# Altium PCB IN-14 Nixie Clock.PcbDoc
Units mm, origin at the board's own origin, x right, y up, seen from the top; angles counter-clockwise.
Board outline 150 x 70 mm, 2 copper layers (Top Layer, Bottom Layer); 89 components, 115 nets, 425 pads, 109 vias.
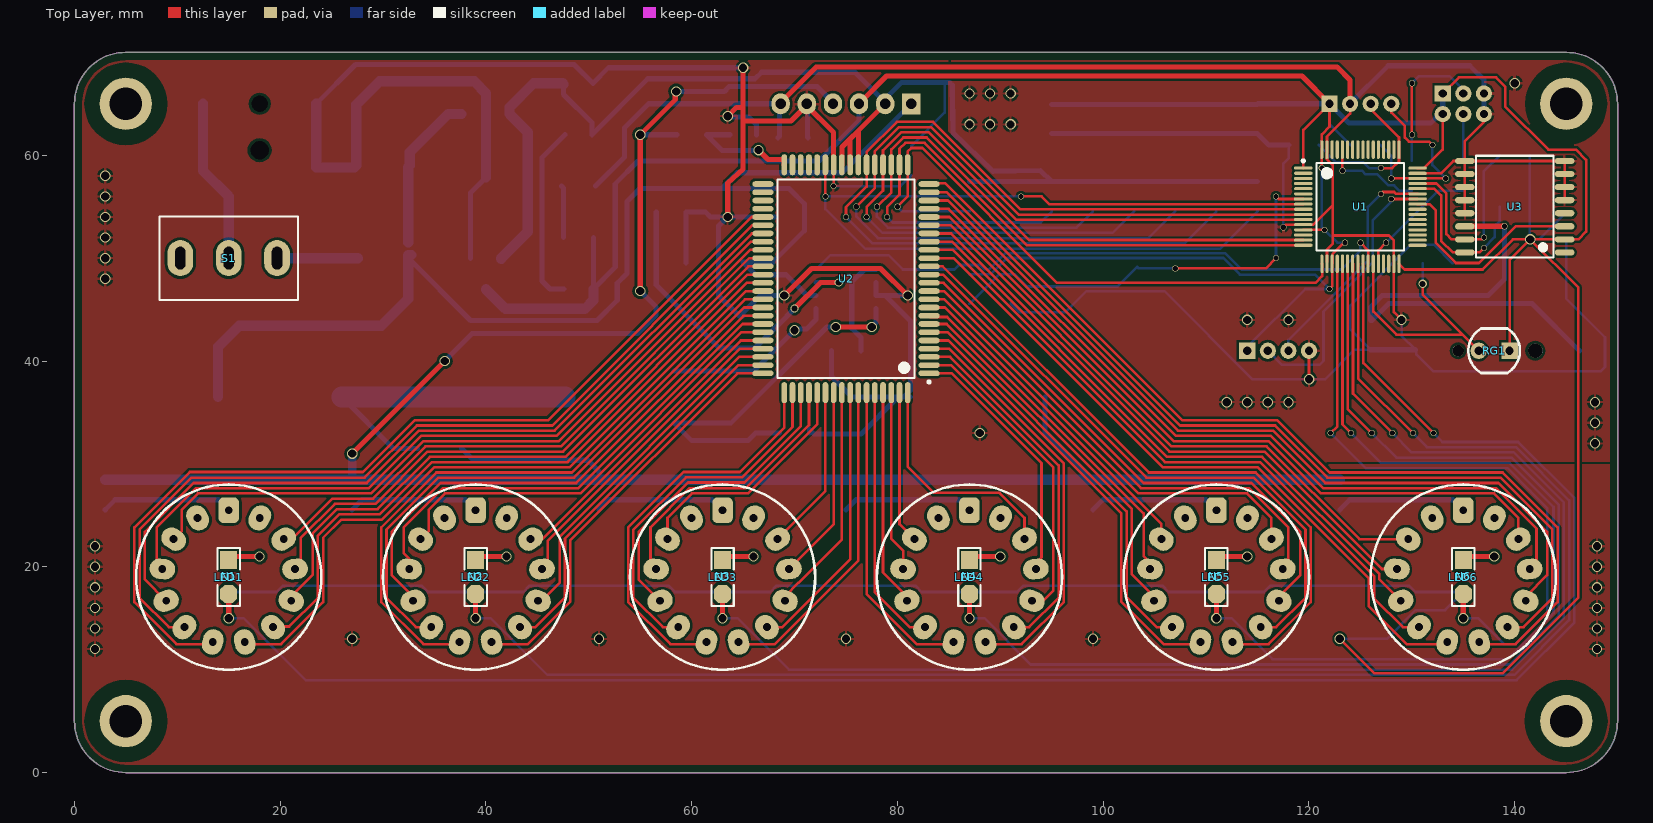
[diagram p0: Top Layer view]
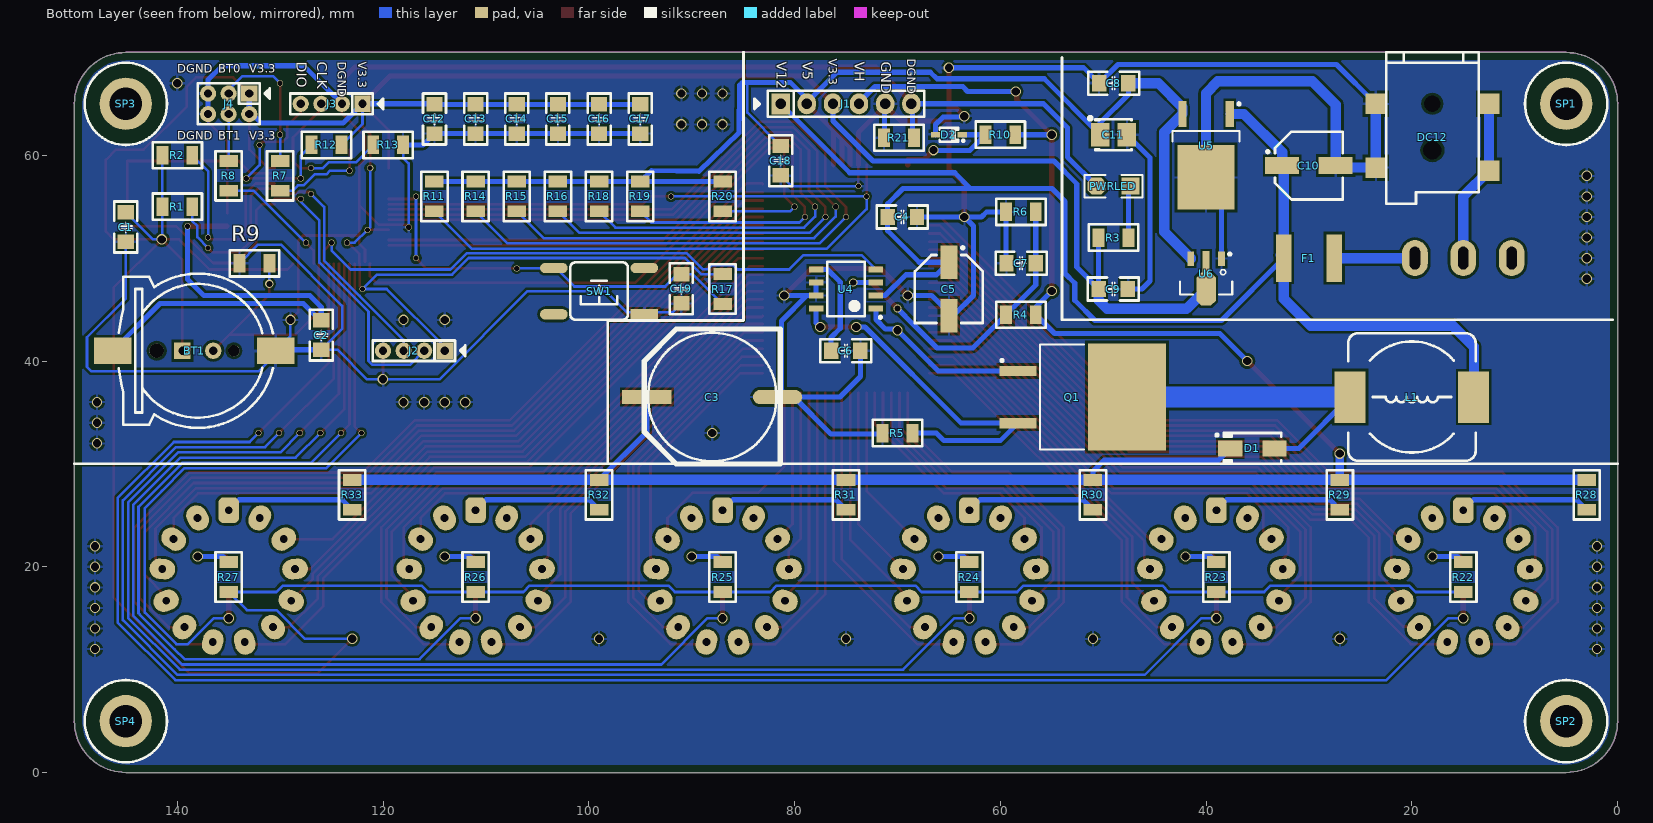
[diagram p1: Bottom Layer view, seen from below]
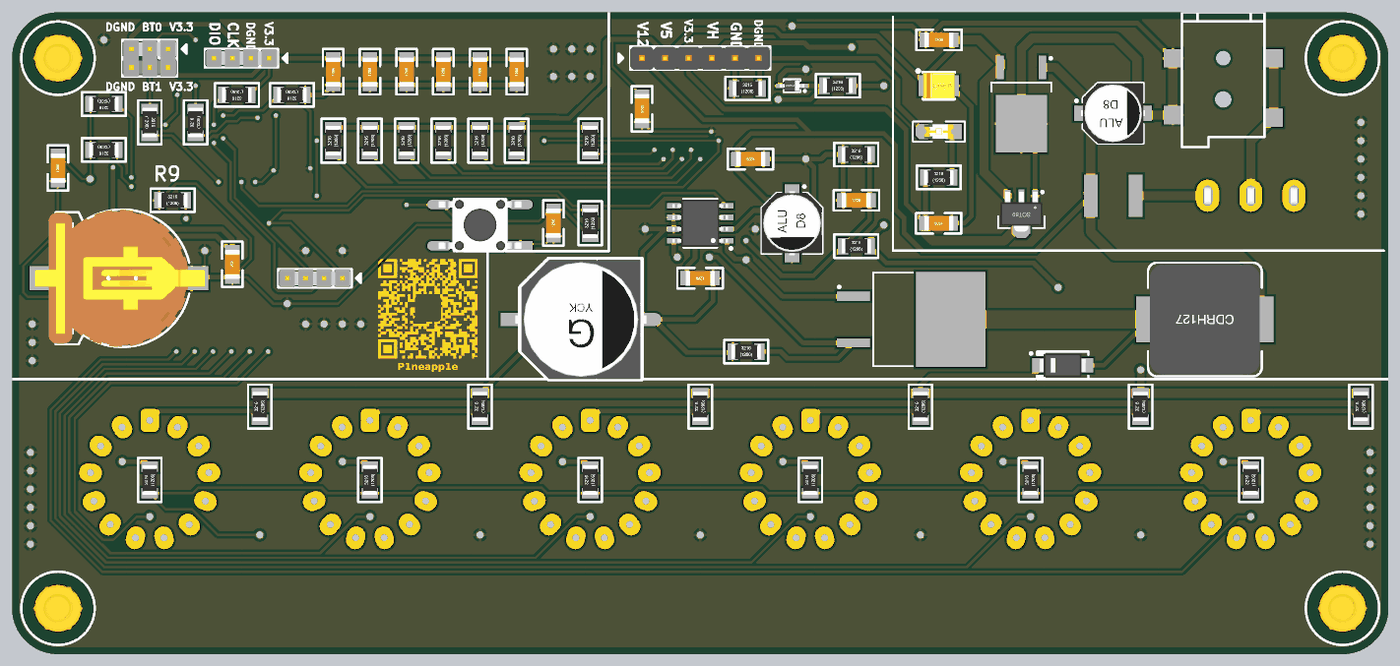
[diagram p2: 3D render of the assembled board from below, using the file's embedded part models]

## Layer stack, top to bottom
Top Solder: solder mask 0.0102, Solder Resist, Dk 3.5
Top Layer: signal copper 0.0356
Dielectric 1: dielectric 0.32, FR-4, Dk 4.8
Bottom Layer: signal copper 0.0356
Bottom Solder: solder mask 0.0102, Solder Resist, Dk 3.5

## Board outline
0,5 0,65 cw(c5,65) 5,70 145,70 cw(c145,65) 150,65 150,5 cw(c145,5) 145,0 5,0 cw(c5,5)

## Design rules (kind name [scope] priority, off if disabled: settings)
Clearance Except [InComponentClass('IN-14 Nixie Clock') vs OnLayer(Keepout)] p1: gap=0 ignorepadtopadclearanceinfootprint=TRUE
Clearance [All] p2: gap=0.254 ignorepadtopadclearanceinfootprint=TRUE except(0: Arc-Hole Track-Hole SMDPad-Hole THPad-Hole Via-Hole Fill-Hole Poly-Hole Region-Hole Text-Hole; 0.18: Arc-SMDPad Track-SMDPad; 0.2: Arc-Arc Arc-Track Track-Track)
ComponentClearance [All] p1 off: gap=0.254 collisioncheckmode=3 verticalgap=0 showdistances=FALSE
PolygonConnect [All] p1: connectstyle=Relief reliefconductorwidth=0.254 reliefentries=4 polygonreliefangle="90 Angle" airgapwidth=0.254
RoutingVias [All] p1: holewidth=0.5 width=0.6 viastyle="Through Hole" minholewidth=0.3 minwidth=0.6 maxholewidth=1 maxwidth=4
SolderMaskExpansion [All] p1: expansion=0.102
Width [All] p1: maxlimit=2 minlimit=0.254 preferedwidth=0.254 minimp=50.000000 maximp=50.000000 favimp=50.000000
29 further rules are at their usual default settings.

## Components (designator, comment, footprint, x,y, rotation, side; value= is the part's Value field where it differs from the comment)
BT1 "CR1220 holder" CR1220-2 138,41 r180 bottom locked
C1 "0.1u" "C 1206_L" 145,53 r90 bottom locked
C2 "0.1u" "C 1206_L" 126,42.5 r90 bottom
C3 "Cap Pol1" "CM G(12.5*13.5)" 88,36.5 r0 bottom locked value="10u 250V"
C4 "0.1u" "C 1206_L" 69.5,54 r0 bottom locked
C5 "Cap Pol1" CAP-6.6X6.6X7 65,47 r270 bottom locked value="220u 16V"
C6 "0.1u" "C 1206_L" 75,41 r0 bottom locked
C7 "0.1u" "C 1206_L" 58,49.5 r180 bottom locked
C8 "0.1u" "C 1206_L" 49,67 r180 bottom
C9 "0.1u" "C 1206_L" 49,47 r0 bottom
C10 "Cap Pol1" CAP-6.6X6.6X7 30,59 r180 bottom locked value="220u 16V"
C11 "TA" CAP-TANTALUM-B 49,62 r180 bottom value=10uF
C12 "0.1u" "C 1206_L" 115,63.5 r90 bottom locked
C13 "0.1u" "C 1206_L" 111,63.5 r90 bottom locked
C14 "0.1u" "C 1206_L" 107,63.5 r90 bottom locked
C15 "0.1u" "C 1206_L" 103,63.5 r90 bottom locked
C16 "0.1u" "C 1206_L" 99,63.5 r90 bottom locked
C17 "0.1u" "C 1206_L" 95,63.5 r90 bottom locked
C18 "0.1u" "C 1206_L" 81.35,59.5 r270 bottom
C19 "0.1u" "C 1206_L" 91,47 r90 bottom locked
D1 "RS1G 400V" SMA 35.5,31.5 r0 bottom
D2 "MM3Z75" SOD-323 65,62 r180 bottom locked
DC12 "DC12V" DC-5mm贴片 18,70 r270 bottom locked
F1 "Fuse 1" SMD2018P100TF 30,50 r0 bottom locked
J1 "HDR1x6" PIN-6-2.54-1.0 75,65 r180 bottom locked
J2 "HDR1x4" PIN-4-2.0-0.8 117,41 r0 bottom locked
J3 "HDR1x4" PIN-4-2.0-0.8 125,65 r0 bottom locked
J4 "HDR2x3" PIN-2X3-2.0-0.8 135,65 r0 bottom locked
L1 "Inductor Iron" CDRH127 20,36.5 r0 bottom locked value=220uH
LED1 "LED" "LED 1206W" 15,19 r270 top locked
LED2 "LED" "LED 1206W" 39,19 r270 top locked
LED3 "LED" "LED 1206W" 63,19 r270 top locked
LED4 "LED" "LED 1206W" 87,19 r270 top locked
LED5 "LED" "LED 1206W" 111,19 r270 top locked
LED6 "LED" "LED 1206W" 135,19 r270 top locked
N1 "ИН-14" IN14 15,19 r180 top locked
N2 "ИН-14" IN14 39,19 r180 top locked
N3 "ИН-14" IN14 63,19 r180 top locked
N4 "ИН-14" IN14 87,19 r180 top locked
N5 "ИН-14" IN14 111,19 r180 top locked
N6 "ИН-14" IN14 135,19 r180 top locked
PWRLED "LED" "LED 1206W" 49,57 r0 bottom
Q1 "IRF840" TO-263-2L 52,36.5 r180 bottom locked
R1 "10k" 1206 140,55 r0 bottom locked
R2 "10k" 1206 140,60 r0 bottom locked
R3 "1k" 1206 49,52 r180 bottom locked
R4 "1.8M" 1206 58,44.5 r180 bottom locked
R5 "10M" 1206 70,33 r180 bottom locked
R6 "16k" 1206 58,54.5 r180 bottom
R7 "10k" 1206 130,58 r90 bottom
R8 "10k" 1206 135,58 r270 bottom
R9 "10k" 1206 132.5,49.5 r180 bottom locked
R10 "240k" 1206 60,62 r180 bottom
R11 "1k" 1206 115,56 r90 bottom locked
R12 "10k" 1206 125.5,61 r0 bottom locked
R13 "10k" 1206 119.5,61 r0 bottom
R14 "1k" 1206 111,56 r90 bottom locked
R15 "1k" 1206 107,56 r90 bottom locked
R16 "1k" 1206 103,56 r90 bottom locked
R17 "10k" 1206 87,47 r90 bottom locked
R18 "1k" 1206 99,56 r90 bottom locked
R19 "1k" 1206 95,56 r90 bottom locked
R20 "1k" 1206 87,56 r90 bottom locked
R21 "0R" 1206 69.85,61.7 r180 bottom locked
R22 "1k" 1206 15,19 r90 bottom locked
R23 "1k" 1206 39,19 r90 bottom locked
R24 "1k" 1206 63,19 r90 bottom locked
R25 "1k" 1206 87,19 r90 bottom locked
R26 "1k" 1206 111,19 r90 bottom locked
R27 "1k" 1206 135,19 r90 bottom locked
R28 "20k" 1206 3,27 r90 bottom locked
R29 "20k" 1206 27,27 r90 bottom locked
R30 "20k" 1206 51,27 r90 bottom locked
R31 "20k" 1206 75,27 r90 bottom locked
R32 "20k" 1206 99,27 r90 bottom locked
R33 "20k" 1206 123,27 r90 bottom locked
RG1 "10K" RG5528 138,41 r180 top locked
S1 "MTS-10x" MTS-10x 15,50 r0 top locked
SP1 "M3" M3x16+6_L 5,65 r180 bottom locked
SP2 "M3" M3x16+6_L 5,5 r180 bottom locked
SP3 "M3" M3x16+6_L 145,65 r180 bottom locked
SP4 "M3" M3x16+6_L 145,5 r180 bottom locked
SW1 "6x6x5" "TSW SMD-6*6*5" 99,46.8 r0 bottom locked
U1 "STM32F103RBT6" LQFP64_N 125,55 r0 top locked
U2 "HV57708" HV57708PG 75,48 r180 top locked
U3 "DS3231" SOP16_75MM 140,55 r180 top locked
U4 "MAX1771" SO-8 75,47 r0 bottom locked
U5 "L78M05" TO-252-2L 40,60 r270 bottom locked
U6 "AMS1117-3.3" SOT89_N 40,48 r0 bottom locked

## Footprints (in the part's own frame and the unit in brackets; to place one, negate y for a bottom-side part, rotate by r counter-clockwise, add the part's x,y. Pads: shape width x height; smd on the part's side, far side on the other; paste and mask are expansions set on the pad)
1206 [mm] "SMD, 1206"
  rect 1.15x1.8 smd: 1(-1.45,0) 2(1.45,0)
  silkscreen extent -2.4,-1.28 2.4,1.28, body extent -1.6,-0.8 1.6,0.8, height 0.55
"C 1206_L" [mil] "无极性贴片电容"
  rect 55x62 smd: 1(-55.12,0) 2(57.09,0)
  silkscreen extent -96,-44 98,44, body extent -63,-32 63,32, height 48
CAP-6.6X6.6X7 [mm] "Polar Capacitors, SMD"
  rect 3.3x1.65 smd: 1(-2.6,0) 2(2.6,0)
  silkscreen extent -4.13,-3.3 3.3,3.3, body extent -3.5,-3.3 3.5,3.3, height 7.7
CAP-TANTALUM-B [mm] "Tantalum Capacitor Case B, SMD"
  rect 1.8x2.25 smd: 1(-1.3,0) 2(1.3,0)
  silkscreen extent -2.38,-1.5 1.75,1.73, body extent -1.75,-1.4 1.75,1.4, height 1.9
CDRH127 [mm] "12*12*8mm（长宽高）"
  rect 3x5 smd: 1(-6,0) 2(6,0)
  silkscreen extent -6.2,-6.2 6.2,6.2, body extent -6,-6 6,6, height 7.8
"CM G(12.5*13.5)" [mm] "贴片电解电容，直径12.5mm，高13.5mm"
  rect 4.8x1.4 smd: 1(6.35,0)
  oval 4.8x1.4 smd: 2(-6.35,0)
  silkscreen extent -6.6,-6.6 6.6,6.5, body extent -7.15,-6.5 7.15,6.5, height 13.5
CR1220-2 [mm]
  round 1.4 hole 1.4 unplated: 0(-4,0)
  round 1.1 hole 1.1 unplated: 0(3.5,0)
  rect 3.66x2.6 smd: 1(-8.28,0) 2(7.57,0)
  silkscreen extent -7.68,-7.5 7.31,7.5, body extent -9.5,-7.5 9,7.5, height 4
DC-5mm贴片 [mm]
  round 0 hole 1.6 unplated: 0(5,0)
  round 0 hole 1.8 unplated: 0(9.5,0)
  rect 2x2 smd: 1(5,5.5) 1(11.5,5.5) 2(5,-5.5) 3(11.2,-5.5)
  silkscreen extent 0,-4.5 14.7,4.5
HV57708PG [mm] "QFP, 80-Leads, Body 17.40x23.40mm, Pitch 0.80mm, IPC Medium Density"
  oval 2.05x0.55 smd: 1(-8.075,9.2) 2(-8.075,8.4) 3(-8.075,7.6) 4(-8.075,6.8) 5(-8.075,6) 6(-8.075,5.2) 7(-8.075,4.4) 8(-8.075,3.6) 9(-8.075,2.8) 10(-8.075,2) 11(-8.075,1.2) 12(-8.075,0.4) 13(-8.075,-0.4) 14(-8.075,-1.2) 15(-8.075,-2) 16(-8.075,-2.8) 17(-8.075,-3.6) 18(-8.075,-4.4) 19(-8.075,-5.2) 20(-8.075,-6) 21(-8.075,-6.8) 22(-8.075,-7.6) 23(-8.075,-8.4) 24(-8.075,-9.2) 41(8.075,-9.2) 42(8.075,-8.4) 43(8.075,-7.6) 44(8.075,-6.8) 45(8.075,-6) 46(8.075,-5.2) 47(8.075,-4.4) 48(8.075,-3.6) 49(8.075,-2.8) 50(8.075,-2) 51(8.075,-1.2) 52(8.075,-0.4) 53(8.075,0.4) 54(8.075,1.2) 55(8.075,2) 56(8.075,2.8) 57(8.075,3.6) 58(8.075,4.4) 59(8.075,5.2) 60(8.075,6) 61(8.075,6.8) 62(8.075,7.6) 63(8.075,8.4) 64(8.075,9.2)
  oval 0.55x2.05 smd: 25(-6,-11.075) 26(-5.2,-11.075) 27(-4.4,-11.075) 28(-3.6,-11.075) 29(-2.8,-11.075) 30(-2,-11.075) 31(-1.2,-11.075) 32(-0.4,-11.075) 33(0.4,-11.075) 34(1.2,-11.075) 35(2,-11.075) 36(2.8,-11.075) 37(3.6,-11.075) 38(4.4,-11.075) 39(5.2,-11.075) 40(6,-11.075) 65(6,11.075) 66(5.2,11.075) 67(4.4,11.075) 68(3.6,11.075) 69(2.8,11.075) 70(2,11.075) 71(1.2,11.075) 72(0.4,11.075) 73(-0.4,11.075) 74(-1.2,11.075) 75(-2,11.075) 76(-2.8,11.075) 77(-3.6,11.075) 78(-4.4,11.075) 79(-5.2,11.075) 80(-6,11.075)
  silkscreen extent -8.2,-9.65 6.65,10.15
IN14 [mm]
  rrect50% 2x2.5 hole 0.762: 1(0,-6.5)
  oval 2x2.5 hole 0.762 rot 152.31: 2(-3.021,-5.755)
  oval 2x2.5 hole 0.762 rot 124.62: 3(-5.349,-3.692)
  oval 2x2.5 hole 0.762 rot 96.92: 4(-6.453,-0.784)
  oval 2x2.5 hole 0.762 rot 69.23: 5(-6.078,2.305)
  oval 2x2.5 hole 0.762 rot 41.54: 6(-4.31,4.865)
  oval 2x2.5 hole 0.762 rot 13.85: 7(-1.556,6.311)
  oval 2x2.5 hole 0.762 rot 166.15: 8(1.555,6.311)
  oval 2x2.5 hole 0.762 rot 138.46: 9(4.31,4.866)
  oval 2x2.5 hole 0.762 rot 110.77: 10(6.077,2.305)
  oval 2x2.5 hole 0.762 rot 83.08: 11(6.453,-0.784)
  oval 2x2.5 hole 0.762 rot 55.38: 12(5.349,-3.692)
  oval 2x2.5 hole 0.762 rot 27.69: 13(3.021,-5.755)
  silkscreen extent -9,-9 9,9
"LED 1206W" [mil] "白色1206LED"
  rect 70x65 smd: 1(-65,0)
  oct 70x65 smd: 2(65,0)
  silkscreen extent -111,-43 111,43, body extent -63,-32 63,32, height 40
LQFP64_N [mm] "Thin QFP, 64-Leads, Body 10x10mm, Pitch 0.5mm, IPC Medium Density"
  oval 1.8x0.3 smd: 1(-5.55,3.75) 2(-5.55,3.25) 3(-5.55,2.75) 4(-5.55,2.25) 5(-5.55,1.75) 6(-5.55,1.25) 7(-5.55,0.75) 8(-5.55,0.25) 9(-5.55,-0.25) 10(-5.55,-0.75) 11(-5.55,-1.25) 12(-5.55,-1.75) 13(-5.55,-2.25) 14(-5.55,-2.75) 15(-5.55,-3.25) 16(-5.55,-3.75) 33(5.55,-3.75) 34(5.55,-3.25) 35(5.55,-2.75) 36(5.55,-2.25) 37(5.55,-1.75) 38(5.55,-1.25) 39(5.55,-0.75) 40(5.55,-0.25) 41(5.55,0.25) 42(5.55,0.75) 43(5.55,1.25) 44(5.55,1.75) 45(5.55,2.25) 46(5.55,2.75) 47(5.55,3.25) 48(5.55,3.75)
  oval 0.3x1.8 smd: 17(-3.75,-5.55) 18(-3.25,-5.55) 19(-2.75,-5.55) 20(-2.25,-5.55) 21(-1.75,-5.55) 22(-1.25,-5.55) 23(-0.75,-5.55) 24(-0.25,-5.55) 25(0.25,-5.55) 26(0.75,-5.55) 27(1.25,-5.55) 28(1.75,-5.55) 29(2.25,-5.55) 30(2.75,-5.55) 31(3.25,-5.55) 32(3.75,-5.55) 49(3.75,5.55) 50(3.25,5.55) 51(2.75,5.55) 52(2.25,5.55) 53(1.75,5.55) 54(1.25,5.55) 55(0.75,5.55) 56(0.25,5.55) 57(-0.25,5.55) 58(-0.75,5.55) 59(-1.25,5.55) 60(-1.75,5.55) 61(-2.25,5.55) 62(-2.75,5.55) 63(-3.25,5.55) 64(-3.75,5.55)
  silkscreen extent -5.67,-4.25 4.25,4.57, body extent -5,-5 5,5, height 1.6
M3x16+6_L [mm] "M3铜柱，长：16mm，螺纹长：6mm                    @sucaita.com 素材塔"
  round 5.08 hole 3.175: 1(0,0)
  silkscreen extent -4,-4 4,4, body extent -2.7,-2.35 2.7,2.35, height 16.05
MTS-10x [mm] "MTS10系列3脚扭子开关                    @sucaita.com 素材塔"
  oval 2.5x3.5 hole 1 slot 2.2 at 90 deg unplated: 1(-4.7,0) 2(0,0) 3(4.7,0)
  silkscreen extent -6.73,-4.06 6.73,4.06, body extent -6.6,-3.95 6.6,3.95, height 30.47
PIN-2X3-2.0-0.8 [mm] "Pin Header"
  rect 1.575x1.575 hole 0.8: 1(-2,-1)
  round 1.575 hole 0.8: 2(-2,1) 3(0,-1) 4(0,1) 5(2,-1) 6(2,1)
  silkscreen extent -4.01,-2 3,2, body extent -3,-2 3,2, height 5.31
PIN-4-2.0-0.8 [mm] "Pin Header"
  rect 1.575x1.575 hole 0.8: 1(-3,0)
  round 1.575 hole 0.8: 2(-1,0) 3(1,0) 4(3,0)
  silkscreen extent -5.01,-1 4,1, body extent -4,-1 4,1, height 5.31
PIN-6-2.54-1.0 [mil] "Pin Header"
  rect 70x80 hole 39.37: 1(-250,0)
  oval 70x80 hole 39.37: 2(-150,0) 3(-50,0) 4(50,0) 5(150,0) 6(250,0)
  silkscreen extent -350,-50 300,50, body extent -300,-50 300,50, height 398
RG5528 [mm] "光敏电阻 脚距：3mm"
  rect 1.6x1.6 hole 0.8: 1(-1.5,0)
  round 1.6 hole 0.8: 2(1.5,0)
  silkscreen extent -2.5,-2.16 2.5,2.16, body extent -2.5,-2.15 2.5,2.15, height 1.9
SMA [mm] "DO-214AC"
  rect 2.35x1.55 smd: 1(-2.15,0) 2(2.15,0)
  silkscreen extent -2.8,-1.5 3.58,1.5, body extent -2.6,-1.3 2.6,1.3, height 2.64
SMD2018P100TF [mm]
  rect 1.5x4.6 smd: 1(-2.45,0) 2(2.45,0)
SO-8 [mm] "SOIC, 8PIN"
  rect 1.4x0.6 smd: 1(-2.9,1.905) 2(-2.9,0.635) 3(-2.9,-0.635) 4(-2.9,-1.905) 5(2.9,-1.905) 6(2.9,-0.635) 7(2.9,0.635) 8(2.9,1.905)
  silkscreen extent -3.48,-2.65 1.82,2.88, body extent -3.03,-2.57 3.03,2.57, height 1.95
SOD-323 [mm] "SOD-323"
  rect 0.9x0.5 smd: 1(-1.3,0) 2(1.3,0)
  silkscreen extent -0.9,-0.67 1.49,0.67, body extent -1.35,-0.62 1.35,0.63, height 1.1
SOP16_75MM [mm]
  oval 1.9x0.6 smd: 1(-4.85,4.445) 2(-4.85,3.175) 3(-4.85,1.905) 4(-4.85,0.635) 5(-4.85,-0.635) 6(-4.85,-1.905) 7(-4.85,-3.175) 8(-4.85,-4.445) 9(4.85,-4.445) 10(4.85,-3.175) 11(4.85,-1.905) 12(4.85,-0.635) 13(4.85,0.635) 14(4.85,1.905) 15(4.85,3.175) 16(4.85,4.445)
  silkscreen extent -3.75,-4.95 3.75,4.95
SOT89_N [mm] "4.6x4.3x1.6mm(长宽高)                    @sucaita.com 素材塔"
  rect 0.65x1.4 smd: 1(-1.5,-1.952) 3(1.5,-1.952)
  rect 0.65x2.1 smd: 2(0,-1.626)
  oct 1.9x3.2 smd: 2(0,1.016)
  silkscreen extent -2.54,-2.52 2.54,1.52, body extent -2.3,-2.4 2.3,1.9, height 1.6
TO-252-2L [mm]
  rect 2.55x0.8 smd: 1(-4,2.3) 2(-4,-2.3)
  rect 6.25x5.55 smd: 3(2.15,0)
  silkscreen extent -5.12,-3.25 -1.35,3.32
TO-263-2L [mm]
  rect 3.6x1 smd: 1(-6.3,2.54) 3(-6.3,-2.54)
  rect 7.6x10.4 smd: 2(4.3,0)
  silkscreen extent -7.98,-5.1 0.15,5.1
"TSW SMD-6*6*5" [mm] "6*6*5mm"
  rect 2.7x1 smd: 1(-4.4,2.261)
  oval 2.7x1 smd: 2(-4.4,-2.239) 3(4.4,-2.239) 4(4.4,2.261)
  silkscreen extent -2.79,-2.79 2.79,2.79, body extent -4.5,-3 4.5,3, height 4.95

## Part data
BT1: library part BATTERY
C1 C2 C4 C6 C7 C8 C9 C12 C13 C14 C15 C16 C17 C18 C19: library part CAP, "Capacitor"
C3: library part "Cap Pol1_2", "Polarized Capacitor (Radial)", LatestRevisionDate=17-Jul-2002, LatestRevisionNote="Re-released for DXP Platform.", PackageDescription="Polarized Capacitor (Radial); 2 Leads", PackageReference=RB7.6-15, Published=8-Jun-2000, Publisher="Altium Limited"
C5 C10: "Polarized Capacitor (Radial)", LatestRevisionDate=17-Jul-2002, LatestRevisionNote="Re-released for DXP Platform.", PackageDescription="Polarized Capacitor (Radial); 2 Leads", PackageReference=RB7.6-15, Published=8-Jun-2000, Publisher="Altium Limited"
C11: library part "Cap Pol1_1", "Polarized Capacitor (Radial)", LatestRevisionDate=17-Jul-2002, LatestRevisionNote="Re-released for DXP Platform.", PackageReference=RB7.6-15, Published=8-Jun-2000, Publisher="Altium Limited"
D1: library part "D Schottky", "Schottky Diode", Code_JEDEC=DO-214-AA, LatestRevisionDate=17-Jul-2002, LatestRevisionNote="Re-released for DXP Platform.", PackageDescription="DO-214-AA/SMB; 2 C-Bend Leads; Body 5.3 x 3.6 mm, inc. leads (LxW)", PackageReference=SMB, Published=8-Jun-2000, Publisher="Altium Limited"
D2: library part "Diode 11DQ03", "Schottky Rectifier", Code_JEDEC=DO-204-AL, ComponentLink1Description="Manufacturer Link", ComponentLink1URL=http://www.irf.com/, ComponentLink2Description=Datasheet, ComponentLink2URL=http://www.irf.com/product-info/datasheets/data/11dq03.pdf, DatasheetVersion=Dec-1997, LatestRevisionDate=17-Jul-2002, LatestRevisionNote="Re-released for DXP Platform.", PackageDescription="Diode, Axial; Body 5.2 x 2.7 mm (LxDia. max), Lead Dia. 0.86 mm (max)", PackageReference=DO-204AL, Published=8-Jun-2000, Publisher="Altium Limited"
DC12: library part 电源插座5.4mm
F1: "Fuse", LatestRevisionDate=17-Jul-2002, LatestRevisionNote="Re-released for DXP Platform.", PackageDescription="Thru-Hole; 2 Leads", PackageReference=PIN-W2/E2.8, Published=8-Jun-2000, Publisher="Altium Limited"
J1 J2 J3 J4: "Connector"
L1: "Magnetic-Core Inductor", LatestRevisionDate=17-Jul-2002, LatestRevisionNote="Re-released for DXP Platform.", PackageDescription="Axial Device, Thru-Hole; 2 Leads; 0.9 in Pin Spacing", PackageReference=AXIAL-0.9, Published=24-Mar-1999, Publisher="Altium Limited"
Q1: library part NMOS-2, "N-Channel Power MOSFET", ComponentLink1Description="Manufacturer Link", ComponentLink1URL=http://www.irf.com/, DatasheetVersion=PD-9.814, LatestRevisionDate=17-Jul-2002, LatestRevisionNote="Re-released for DXP Platform.", Note="Pin 2 is electrically connected to pin 4.", PackageDescription="TO, Thru-Hole, Vertical, Heatsink Mounted; 3 In-Line Leads; Pitch 2.54 mm", PackageReference=TO-220AB, PackageVersion=Feb-1997, Published=8-Jun-2000, Publisher="Altium Limited"
R1 R2 R3 R4 R5 R6 R7 R8 R9 R10 R11 R12 R13 R14 R15 R16 R17 R18 R19 R20 R21 R22 R23 R24 R25 R26 R27 R28 R29 R30 R31 R32 R33: library part RES, "Resistor"
RG1: library part RG, "光敏电阻"
S1: "MTS10x系列3脚扭子开关"
SP1 SP2 SP3 SP4: library part 铜柱加头小焊盘, "铜柱"
SW1: library part "TSW SMD-6x6", "贴片6x6轻触开关"
U1: "STM32 ARM-based 32-bit MCU with 128 Kbytes Flash, 64-pin LQFP, Industrial Temperature", ComponentLink1Description="Manufacturer Link", ComponentLink1URL=www.st.com/stm32, ComponentLink2Description=Datasheet, ComponentLink2URL=http://www.st.com/stonline/products/literature/ds/13587.pdf, DatasheetVersion="rev6, Mar-2008", PackageDescription="64-Pin Low-Profile Quad Flat Pack, 10 x 10 mm Body, 0.5 mm Pitch (LQFP64)", PackageReference=LQFP64, PackageVersion=Mar-2008, Published=30-May-2008, Publisher="Altium Limited"
U2: library part HV57708PG
U3: library part DS3231SN

## Via types
v1: diameter 1, hole 0.8, Top Layer to Bottom Layer, tented both sides, 69 vias
v2: diameter 0.6, hole 0.5, Top Layer to Bottom Layer, tented both sides, 37 vias
v3: diameter 0.8, hole 0.6, Top Layer to Bottom Layer, tented both sides, 3 vias

## Nets (pads, with @x,y where several pads share a name; then routed paths per layer and width w, separated by ;. In a path a pad name is that pad's centre, name@x,y a point inside that pad or via, vN(x,y) a via of type N, cw(c..) or ccw(c..) an arc to the next point about the centre after c; other vN are vias at no path point)
Boost_On_Off: U1.26 U4.4 | length 59.6
  Top Layer w0.254: v2(125,51.5) 125.75,50.75 U1.26
  Bottom Layer w0.254: U4.4 73.487,50.292 79.121,50.292 80.518,48.895 85.536,48.895 85.973,49.332 88.027,49.332 88.455,48.904 88.892,48.904 90.461,50.473 111.869,50.473 113.447,48.895 123.145,48.895 125,50.75 v2(125,51.5)
BOOT0: R7.1 U1.60 | length 9.6
  Top Layer w0.254: v2(123.25,58.5) U1.60
  Bottom Layer w0.254: v2(123.25,58.5) 125.142,58.5 125.5,58.142 126.643,58.142 127.716,57.069 128.281,57.069 128.8,56.55 R7.1
BOOT1: R8.2 U1.28 | length 11.7
  Top Layer w0.254: U1.28 126.75,50.75 v2(127.5,51.5)
  Bottom Layer w0.254: v2@127.663,51.664 132.55,56.55 R8.2
DGND: BT1.2 C1.1 C2.1 C12.1 C13.1 C14.1 C15.1 C16.1 C17.1 C19.1 J1.6 J2.4 J3.2 J4.5 J4.6 PWRLED.2 R9.1 R13.1 R21.2 SW1.1 U1.12 U1.18 U1.31 U1.47 U1.63 U3.5 U3.6 U3.7 U3.8 U3.9 U3.10 U3.11 U3.12 U3.13 | length 305.1
  Top Layer w0.254: v2(117.5,53) 117.75,53.25 U1.12 120.433,53.25 122.301,55.118 ; J2.4 120,38.242 v1(120.015,38.227) ; U1.18@121.75,49.652 121.75,50.841 122.301,51.392 122.301,52.197 ; J3.2 124,64.056 121.75,61.806 U1.63 121.75,59.606 122.301,59.055 122.301,55.118 ; v1(129,44) 128.25,44.75 U1.31 128.25,51.713 127.766,52.197 122.301,52.197 ; U1.47 132.837,58.25 134.032,59.445 U3.9 ; U3.13 U3.12 U3.11 U3.10 U3.9 ; J4.6 137,63.213 135.15,61.363 U3.9 ; U3.5 U3.6 U3.7 U3.8 U3.9 ; 122.301,52.197 122.301,55.118
  Top Layer w0.5: J1.6 68.65,65.127 72.103,68.58 122.738,68.58 124,67.318 J3.2
  Bottom Layer w0.254: J1.6@68.4,64.75 J1.6 ; C19.1 91.861,44.739 96.301,44.739 98.352,46.79 105.937,46.79 114.5,38.227 v1(120.015,38.227) 121.539,38.227 124.412,41.1 C2.1 123.952,43.148 123.964,43.16 123.964,45.365 129.907,51.308 132.142,51.308 R9.1 ; v2(117.5,53) 117.5,59.202 118.05,59.752 R13.1 ; v1(129,44) 129,42.43 130.33,41.1 BT1.2 130.43,40.639 132.08,38.989 148.336,38.989 148.774,39.427 148.774,42.311 145,46.085 C1.1
  Bottom Layer w0.5: PWRLED.2 53.467,59.816 53.467,62.671 55.796,65 68.15,65 68.4,64.75 68.525,64.625 68.525,61.825 R21.2 ; C17.1 C16.1 C15.1 C14.1 C13.1 C12.1 116.1,61 R13.1 ; J3.2 127.707,68.707 135.636,68.707 137,67.343 J4.5 J4.6 ; C2.1 BT1.2@130.33,41.1
  other v1: 147.8,32 147.8,34 112,36 114,36 116,36 118,36 147.8,36 114,44 118,44 87,63 89,63 91,63 87,66 89,66 91,66 140,67
FB: C7.2 R4.1 R6.2 U4.3 | length 32.2
  Top Layer w0.5: v3(70,45.095) 72.54,47.635 v3(74.3,47.635)
  Bottom Layer w0.5: R6.2 C7.2 56.55,47.4 R4.1 62.675,41.275 66.167,41.275 68.349,43.457 68.362,43.457 v3(70,45.095) ; U4.3 v3(74.3,47.635)
GND: C3.2 C4.1 C5.2 C6.1 C7.1 C8.1 C9.1 C10.2 C11.2 C18.2 D2.1 DC12.2 DC12.3 J1.5 R5.1 R6.1 R21.1 U2.34 U4.6 U4.7 U5.3 U6.1 | length 238.6
  Top Layer w0.254: v2(73.8,57) U2.34
  Top Layer w0.5: v1(63.5,54) 63.5,57.31 65,58.683 65,63.325 ; v1(63.5,63.8) 64.343,64.643 65,64.643 ; v1(65,68.5) 65,64.643 ; v1(69,46.365) 71.635,49 78.365,49 v1(81,46.365) ; U2.34 73.8,62.217 71.167,64.85 69.642,63.325 65,63.325 ; 65,63.325 65,64.643
  Bottom Layer w0.254: C10.2@27.2,58.8 C10.2 ; C7.1 C7.1@59.45,49.55 ; C5.2@64.592,44.4 C5.2 ; J1.5 J1.5@71.3,64.89 ; v2(73.8,57) 80.3,57 C18.2
  Bottom Layer w0.5: DC12.2 27.334,68.834 48.566,68.834 C8.1 51.9,68.5 v1(65,68.5) ; U6.1 38.5,56.35 U5.3 ; C9.1 46.218,47 45.453,47.765 45.453,59.753 C11.2 ; C7.1@59.45,49.55 R6.1 61.324,54.5 61.824,54 v1(63.5,54) ; v1(63.5,63.8) 63.596,63.704 65.582,63.704 66.3,62.986 D2.1 ; C5.2@64.592,44.4 62.611,46.381 62.611,53.111 v1(63.5,54) ; C5.2 65,44.69 66.675,46.365 v1(69,46.365) ; C4.1 v1(63.5,54) ; R21.1 71.245,61.755 71.245,64.835 J1.5@71.3,64.89 ; R5.1 71.45,33.325 71.882,32.893 76.459,32.893 C3.2@80.066,36.5 ; C6.1 73.6,38.484 75.584,36.5 C3.2@80.066,36.5 ; U4.6 U4.7 78.814,46.365 ; v1(81,46.365) 78.814,46.365 ; C3.2@81.28,36.5 C3.2@80.616,36.5 ; 78.814,46.365 81.28,43.899 81.28,37.164 C3.2@80.616,36.5 ; C3.2@80.066,36.5 C3.2@80.616,36.5
  Bottom Layer w1: DC12.2 DC12.3 C10.2@27.2,58.8 ; C10.2 27.4,64.898 29.685,67.183 38.862,67.183 40,66.045 U5.3
  other v1: 2,12 148,12 27,13 51,13 75,13 99,13 2,14 148,14 2,16 148,16 2,18 148,18 2,20 148,20 2,22 148,22 88,33 3,48 3,50 3,52 3,54 3,56 3,58
HV_CLK: R14.1 U1.9 U2.30 | length 92.7
  Top Layer w0.254: v2(75,54) 75,54.963 77,56.963 U2.30 77,60.312 79.934,63.246 83.475,63.246 91.984,54.737 91.989,54.742 U1.9@119.45,54.742
  Bottom Layer w0.254: v2(75,54) 77.565,51.435 107.885,51.435 R14.1
HV_DIN1: R20.1 U1.17 U2.25 | length 60.3
  Top Layer w0.254: v2(80,55) 81,56 U2.25 81,60.358 81.348,60.706 82.423,60.706 95.529,47.6 120.625,47.6 121.273,48.248 121.273,49.427 U1.17
  Bottom Layer w0.254: v2(80,55) 80.45,54.55 R20.1
HV_DIN2: R19.1 U1.16 U2.26 | length 67.4
  Top Layer w0.254: v2(79,54) 79,54.963 80.2,56.163 U2.26 80.2,60.638 80.776,61.214 82.633,61.214 92.597,51.25 U1.16
  Bottom Layer w0.254: v2(79,54) 79.533,53.467 93.917,53.467 R19.1
HV_DIN3: R18.1 U1.15 U2.27 | length 73.9
  Top Layer w0.254: v2(78,55) 79.4,56.4 U2.27 79.4,60.557 80.565,61.722 82.844,61.722 92.808,51.758 U1.15@119.45,51.758
  Bottom Layer w0.254: v2(78,55) 78,54.037 79.078,52.959 97.409,52.959 R18.1
HV_DIN4: R16.1 U1.11 U2.28 | length 79.8
  Top Layer w0.254: v2(77,54) 77,54.963 78.6,56.563 U2.28 78.6,60.475 80.355,62.23 83.054,62.23 91.563,53.721 U1.11@119.45,53.721
  Bottom Layer w0.254: v2(77,54) 78.549,52.451 100.901,52.451 R16.1
HV_LE: R15.1 U1.10 U2.29 | length 86.2
  Top Layer w0.254: v2(76,55) 77.8,56.8 U2.29 77.8,60.394 80.144,62.738 83.265,62.738 91.774,54.229 U1.10@119.45,54.229
  Bottom Layer w0.254: v2(76,55) 76,54.037 78.094,51.943 104.393,51.943 R15.1
HV_POL: R11.1 U1.8 U2.35 | length 96.2
  Top Layer w0.254: v2(73,56) U2.35 ; v2(92,56) 94,56 94.75,55.25 U1.8
  Bottom Layer w0.254: v2(92,56) v2(73,56) 73,54.781 76.854,50.927 111.377,50.927 R11.1
I\N\T\/SQW: U1.41 U3.3 | length 20
  Top Layer w0.254: U1.41 131.692,55.25 132.334,54.608 132.334,51.479 134.283,49.53 136.525,49.53 140.09,53.095 U3.3
LED1: LED1.2 U1.25 | length 185.6
  Top Layer w0.254: U1.25@125.236,49.45 125.293,49.393 125.293,39.807 v2(132.1,33)
  Top Layer w0.5: v1(15,15) LED1.2
  Bottom Layer w0.254: v1(15,15) 16.453,15 22.47,8.982 134.82,8.982 140.17,8.982 145.796,14.609 145.796,26.666 140.331,32.131 132.969,32.131 v2(132.1,33)
LED2: LED2.2 U1.24 | length 161.3
  Top Layer w0.254: U1.24@124.782,49.45 124.782,38.318 v2(130.1,33)
  Top Layer w0.5: v1(39,15) LED2.2
  Bottom Layer w0.254: v1(39,15) 40.453,15 45.962,9.49 134.609,9.49 ; v2(130.1,33) 131.477,31.623 140.121,31.623 145.288,26.456 145.288,14.819 139.959,9.49 134.609,9.49
LED3: LED3.2 U1.23 | length 137
  Top Layer w0.254: U1.23@124.274,49.45 124.274,36.826 v2(128.1,33)
  Top Layer w0.5: v1(63,15) LED3.2
  Bottom Layer w0.254: v1(63,15) 64.453,15 69.454,9.998 134.399,9.998 139.749,9.998 144.78,15.029 144.78,26.245 139.91,31.115 129.985,31.115 v2(128.1,33)
LED4: LED4.2 U1.22 | length 112.7
  Top Layer w0.254: U1.22@123.766,49.45 123.766,35.334 v2(126.1,33)
  Top Layer w0.5: v1(87,15) LED4.2
  Bottom Layer w0.254: v1(87,15) 88.453,15 92.946,10.506 134.188,10.506 139.538,10.506 144.272,15.24 144.272,26.035 139.7,30.607 128.493,30.607 v2(126.1,33)
LED5: LED5.2 U1.21 | length 88.4
  Top Layer w0.254: U1.21@123.258,49.45 123.258,33.842 v2(124.1,33)
  Top Layer w0.5: v1(111,15) LED5.2
  Bottom Layer w0.254: v1(111,15) 112.453,15 116.438,11.014 133.978,11.014 139.284,11.014 140.248,11.978 140.292,11.978 143.664,15.351 143.664,15.394 143.764,15.494 143.764,25.825 139.49,30.099 127.001,30.099 v2(124.1,33)
LED6: LED6.2 U1.20 | length 63.8
  Top Layer w0.254: v2(122.1,33) 122.75,33.65 U1.20
  Top Layer w0.5: v1(135,15) LED6.2
  Bottom Layer w0.254: v2(122.1,33) 125.509,29.591 139.279,29.591 141.493,27.377 141.493,27.36 143.156,25.697 143.156,15.561 140.082,12.486 138.966,12.486 136.453,15 v1(135,15)
N1_0: N1.3 U2.50 | length 57.9
  Top Layer w0.254: N1.3 21.168,22.692 25.099,26.623 29.043,26.623 34.123,31.703 47.299,31.703 65.596,50 U2.50
N1_1: N1.12 U2.49 | length 70.1
  Top Layer w0.254: N1.12 10.449,23.491 10.449,25.563 12.017,27.131 28.833,27.131 33.913,32.211 47.089,32.211 65.678,50.8 U2.49
N1_2: N1.11 U2.48 | length 74.7
  Top Layer w0.254: N1.11 7.999,20.332 7.999,23.832 11.807,27.639 28.622,27.639 33.702,32.719 46.878,32.719 65.759,51.6 U2.48
N1_3: N1.10 U2.47 | length 79.7
  Top Layer w0.254: N1.10 6.844,18.774 6.844,23.394 11.596,28.147 28.412,28.147 33.492,33.227 46.668,33.227 65.841,52.4 U2.47
N1_4: N1.9 U2.46 | length 85
  Top Layer w0.254: N1.9 9.19,14.134 6.336,16.989 6.336,23.605 11.386,28.655 28.202,28.655 33.282,33.735 46.457,33.735 65.922,53.2 U2.46
N1_5: N1.8 U2.45 | length 90.4
  Top Layer w0.254: N1.8 13.445,12.486 9.919,12.486 5.828,16.577 5.828,23.815 11.222,29.21 28.038,29.21 33.071,34.243 46.054,34.243 65.811,54 U2.45
N1_6: N1.7 U2.54 | length 68.4
  Top Layer w0.254: N1.7 16.556,12.486 20.082,12.486 24.172,16.577 24.172,22.823 25.941,24.591 29.885,24.591 34.965,29.671 48.141,29.671 65.27,46.8 U2.54
N1_7: N1.6 U2.53 | length 65
  Top Layer w0.254: N1.6 19.368,14.192 20.867,14.192 23.664,16.989 23.664,23.033 25.73,25.099 29.675,25.099 34.755,30.179 47.93,30.179 65.351,47.6 U2.53
N1_8: N1.5 U2.52 | length 62.2
  Top Layer w0.254: N1.5 20.641,16.695 23.156,19.211 23.156,23.243 25.52,25.607 29.464,25.607 34.544,30.687 47.72,30.687 65.433,48.4 U2.52
N1_9: N1.4 U2.51 | length 59.4
  Top Layer w0.254: N1.4 N1.4@22.001,20.332 ; N1.4@22.001,20.066 N1.4@22.001,20.332 ; U2.51 65.515,49.2 47.51,31.195 34.334,31.195 29.254,26.115 25.309,26.115 22.001,22.806 N1.4@22.001,20.332
N2_0: N2.3 U2.60 | length 30.6
  Top Layer w0.254: N2.3 45.493,22.692 45.493,22.712 64.78,42 U2.60
N2_1: N2.12 U2.59 | length 42.8
  Top Layer w0.254: N2.12 34.449,23.491 34.449,24.543 ; 34.449,24.586 34.449,25.563 36.017,27.131 49.193,27.131 64.862,42.8 U2.59
N2_2: N2.11 U2.58 | length 47.4
  Top Layer w0.254: N2.11 32.547,20.793 31.999,21.341 31.999,23.832 35.807,27.639 48.982,27.639 64.943,43.6 U2.58
N2_3: N2.10 U2.57 | length 52.3
  Top Layer w0.254: N2.10 32.923,17.115 30.844,19.194 30.844,23.394 35.596,28.147 48.772,28.147 65.025,44.4 U2.57
N2_4: N2.9 U2.56 | length 57.7
  Top Layer w0.254: N2.9 33.19,14.134 30.336,16.989 30.336,23.605 35.386,28.655 48.562,28.655 65.107,45.2 U2.56
N2_5: N2.8 U2.55 | length 63
  Top Layer w0.254: N2.8 37.445,12.486 33.919,12.486 29.828,16.577 29.828,23.815 35.175,29.163 48.351,29.163 65.188,46 U2.55
N2_6: N2.7 U2.64 | length 41
  Top Layer w0.254: N2.7 40.556,12.486 44.082,12.486 48.194,16.599 48.194,22.54 64.454,38.8 U2.64
N2_7: N2.6 U2.63 | length 37.5
  Top Layer w0.254: N2.6 44.81,14.135 47.686,17.011 47.686,22.751 64.536,39.6 U2.63
N2_8: N2.5 U2.62 | length 34.3
  Top Layer w0.254: N2.5 45.397,16.695 47.178,18.476 47.178,22.961 64.617,40.4 U2.62
N2_9: N2.4 U2.61 | length 31.6
  Top Layer w0.254: N2.4 46.001,20.332 46.001,22.502 64.699,41.2 U2.61
N3_0: N3.3 U2.70 | length 16.2
  Top Layer w0.254: N3.3 73,27.343 U2.70
N3_1: N3.12 U2.69 | length 23.5
  Top Layer w0.254: N3.12 57.651,24.765 60.017,27.131 65.485,27.131 72.2,33.846 U2.69
N3_2: N3.11 U2.68 | length 27
  Top Layer w0.254: N3.11 55.999,20.332 55.999,23.832 59.807,27.639 65.275,27.639 71.4,33.764 U2.68
N3_3: N3.10 U2.67 | length 30.8
  Top Layer w0.254: N3.10 54.844,18.774 54.844,23.394 59.643,28.194 65.111,28.194 70.612,33.695 70.612,36.913 U2.67
N3_4: N3.9 U2.66 | length 35.1
  Top Layer w0.254: N3.9 57.19,14.134 54.336,16.989 54.336,23.605 59.433,28.702 64.901,28.702 69.8,33.601 U2.66
N3_5: N3.8 U2.65 | length 39.3
  Top Layer w0.254: N3.8 61.445,12.486 57.919,12.486 53.828,16.577 53.828,23.815 59.222,29.21 64.69,29.21 69,33.52 U2.65
N3_6: N3.7 U2.74 | length 31.5
  Top Layer w0.254: N3.7 64.556,12.486 68.082,12.486 76.2,20.605 U2.74
N3_7: N3.6 U2.73 | length 27
  Top Layer w0.254: N3.6 68.81,14.135 75.4,20.725 U2.73
N3_8: N3.5 U2.72 | length 22.5
  Top Layer w0.254: N3.5 69.078,17.135 70.407,18.464 70.409,18.464 74.6,22.655 U2.72
N3_9: N3.4 U2.71 | length 18.9
  Top Layer w0.254: N3.4 73.8,24.131 U2.71
N4_0: N4.3 U2.80 | length 22.7
  Top Layer w0.254: U2.80 81,29.744 83.566,27.178 89.936,27.178 92.349,24.765 N4.3
N4_1: N4.12 U2.79 | length 14.8
  Top Layer w0.254: U2.79 80.2,24.143 N4.12
N4_2: N4.11 U2.78 | length 17.6
  Top Layer w0.254: U2.78 79.4,22.708 80.547,21.561 N4.11
N4_3: N4.10 U2.77 | length 21.2
  Top Layer w0.254: U2.77 78.6,19.444 80.923,17.121 N4.10
N4_4: N4.9 U2.76 | length 25.7
  Top Layer w0.254: U2.76 77.8,17.525 81.19,14.134 N4.9
N4_5: N4.8 U2.75 | length 30.2
  Top Layer w0.254: U2.75 77,17.361 81.875,12.486 85.445,12.486 N4.8
N4_6: N4.7 U2.4 | length 40.7
  Top Layer w0.254: U2.4 85.034,41.2 96.172,30.062 96.172,16.577 92.082,12.486 88.556,12.486 N4.7
N4_7: N4.6 U2.3 | length 35.4
  Top Layer w0.254: U2.3 85.116,40.4 95.664,29.852 95.664,16.989 92.81,14.135 N4.6
N4_8: N4.5 U2.2 | length 30.7
  Top Layer w0.254: U2.2 85.197,39.6 95.156,29.641 95.156,17.686 94.165,16.695 N4.5
N4_9: N4.4 U2.1 | length 25.1
  Top Layer w0.254: U2.1 85.279,38.8 94.001,30.078 94.001,20.917 93.453,20.369 N4.4
N5_0: N5.3 U2.10 | length 44.1
  Top Layer w0.254: U2.10 84.556,46 103.425,27.131 113.983,27.131 116.349,24.765 N5.3
N5_1: N5.12 U2.9 | length 32.8
  Top Layer w0.254: U2.9 84.626,45.2 105.651,24.176 N5.12
N5_2: N5.11 U2.8 | length 34.5
  Top Layer w0.254: U2.8 83.194,44.281 84.827,44.281 103.93,25.178 103.93,21.038 104.547,20.421 N5.11
N5_3: N5.10 U2.7 | length 37
  Top Layer w0.254: U2.7 84.79,43.6 102.787,25.603 102.787,19.26 104.923,17.124 N5.10
N5_4: N5.9 U2.6 | length 40.4
  Top Layer w0.254: U2.6 84.871,42.8 102.279,25.393 102.279,17.046 105.19,14.134 N5.9
N5_5: N5.8 U2.5 | length 43.8
  Top Layer w0.254: U2.5 84.953,42 101.771,25.182 101.771,16.593 105.878,12.486 109.445,12.486 N5.8
N5_6: N5.7 U2.14 | length 64.4
  Top Layer w0.254: U2.14 84.404,49.2 104.441,29.163 114.825,29.163 120.172,23.815 120.172,16.577 116.082,12.486 112.556,12.486 N5.7
N5_7: N5.6 U2.13 | length 59
  Top Layer w0.254: U2.13 84.442,48.4 104.187,28.655 114.614,28.655 119.664,23.605 119.664,16.989 116.81,14.135 N5.6
N5_8: N5.5 U2.12 | length 53.7
  Top Layer w0.254: U2.12 84.48,47.6 103.933,28.147 114.404,28.147 119.156,23.394 119.156,19.207 117.078,17.129 N5.5
N5_9: N5.4 U2.11 | length 48.9
  Top Layer w0.254: U2.11 84.506,46.8 103.667,27.639 114.193,27.639 118.001,23.832 118.001,20.057 117.728,19.784 N5.4
N6_0: N6.3 U2.20 | length 71.5
  Top Layer w0.254: U2.20 85.054,54 106.843,32.211 116.087,32.211 121.167,27.131 137.983,27.131 140.349,24.765 N6.3
N6_1: N6.12 U2.19 | length 59.2
  Top Layer w0.254: U2.19 85.136,53.2 106.633,31.703 115.877,31.703 124.887,22.692 N6.12
N6_2: N6.11 U2.18 | length 59
  Top Layer w0.254: U2.18 85.217,52.4 106.422,31.195 115.666,31.195 127.078,19.784 N6.11
N6_3: N6.10 U2.17 | length 60.6
  Top Layer w0.254: U2.17 85.299,51.6 106.212,30.687 115.456,30.687 126.844,19.299 126.844,18.774 N6.10
N6_4: N6.9 U2.16 | length 64.1
  Top Layer w0.254: U2.16 85.381,50.8 106.002,30.179 115.245,30.179 126.336,19.089 126.336,16.92 129.122,14.134 N6.9
N6_5: N6.8 U2.15 | length 67.7
  Top Layer w0.254: U2.15 85.462,50 105.791,29.671 115.035,29.671 125.828,18.878 125.828,16.158 129.5,12.486 133.445,12.486 N6.8
N6_6: N6.7 U2.24 | length 91.7
  Top Layer w0.254: U2.24 83.152,57.277 84.651,57.277 107.685,34.243 116.929,34.243 122.009,29.163 138.825,29.163 144.172,23.815 144.172,16.577 140.082,12.486 136.556,12.486 N6.7
N6_7: N6.6 U2.23 | length 86.3
  Top Layer w0.254: U2.23 84.81,56.4 107.475,33.735 116.718,33.735 121.798,28.655 138.614,28.655 143.664,23.605 143.664,16.948 140.852,14.135 N6.6
N6_8: N6.5 U2.22 | length 81
  Top Layer w0.254: U2.22 84.891,55.6 107.264,33.227 116.508,33.227 121.588,28.147 138.404,28.147 143.156,23.394 143.156,19.204 141.078,17.126 N6.5
N6_9: N6.4 U2.21 | length 76.3
  Top Layer w0.254: U2.21 84.973,54.8 107.054,32.719 116.298,32.719 121.378,27.639 138.193,27.639 142.113,23.719 142.113,20.066 141.831,19.784 N6.4
NetBT1_1: BT1.1 C2.2 U3.14 | length 47.2
  Top Layer w0.5: U3.14 v2(139,53.095)
  Bottom Layer w0.5: C2.2 126,45.25 127.105,46.355 137.414,46.355 139,47.941 v2(139,53.095) ; C2.2@126.1,43.942 127.751,45.593 141.687,45.593 BT1.1
NetC6_2: C6.2 U4.5 | length 9.9
  Bottom Layer w0.5: C6.2 76.45,42.291 75.565,43.176 75.565,47.682 76.788,48.905 U4.5
NetC19_2: C19.2 R17.1 SW1.3 U1.7 | length 41.4
  Top Layer w0.254: v2(107,49) 115.8,49 v2(116.8,50) ; v2(116.8,56) 117.05,55.75 U1.7
  Bottom Layer w0.254: R17.1 89.9,48.45 C19.2 91.377,48.45 92.583,47.244 101.405,47.244 SW1.3@103.3,49.139 ; SW1.3 103.439,49 v2(107,49) ; v2(116.8,50) v2(116.8,56)
NetD1_1: D1.1 L1.2 Q1.2 | length 31.1
  Bottom Layer w0.5: L1.2 31,31.5 D1.1
  Bottom Layer w2: L1.2 Q1.2
NetD2_2: D2.2 R10.1 U2.40 | length 11.2
  Top Layer w0.5: v1(66.5,60.5) 67.425,59.575 68.977,59.575 69,59.552 U2.40
  Bottom Layer w0.5: D2.2 R10.1 62.975,60.475 v1@66.421,60.475
NetDC12_1: DC12.1 S1.2 | length 16
  Bottom Layer w1: DC12.1@12.5,65 12.5,58.5 15,56 S1.2
NetF1_1: F1.1 S1.3 | length 7.9
  Bottom Layer w1: S1.3 F1.1
NetJ4_3: J4.3 R7.2 | length 13.7
  Top Layer w0.254: v2(130,62) v2(130,67)
  Bottom Layer w0.254: R7.2 v2(130,62) ; v2(130,67) 130.691,67.691 133.637,67.691 135,66.328 J4.3
NetJ4_4: J4.4 R8.1 | length 4.5
  Bottom Layer w0.254: R8.1 J4.4
NetLED1_1: LED1.1 R22.2 | length 6.4
  Top Layer w0.5: LED1.1 15.349,21 v1(18,21)
  Bottom Layer w0.5: R22.2 15.55,21 v1(18,21)
NetLED2_1: LED2.1 R23.2 | length 6.4
  Top Layer w0.5: LED2.1 39.349,21 v1(42,21)
  Bottom Layer w0.5: R23.2 39.55,21 v1(42,21)
NetLED3_1: LED3.1 R24.2 | length 6.4
  Top Layer w0.5: LED3.1 63.349,21 v1(66,21)
  Bottom Layer w0.5: R24.2 63.55,21 v1(66,21)
NetLED4_1: LED4.1 R25.2 | length 6.4
  Top Layer w0.5: LED4.1 87.349,21 v1(90,21)
  Bottom Layer w0.5: R25.2 87.55,21 v1(90,21)
NetLED5_1: LED5.1 R26.2 | length 6.4
  Top Layer w0.5: LED5.1 111.349,21 v1(114,21)
  Bottom Layer w0.5: R26.2 111.55,21 v1(114,21)
NetLED6_1: LED6.1 R27.2 | length 6.4
  Top Layer w0.5: LED6.1 135.349,21 v1(138,21)
  Bottom Layer w0.5: R27.2 135.55,21 v1(138,21)
NetN1_1: N1.1 R28.1 | length 13.7
  Bottom Layer w0.254: N1.1@14.742,25.5 N1.1
  Bottom Layer w0.5: R28.1 3.964,26.514 13.986,26.514 N1.1@14.871,25.629 ; N1.1@14.742,25.5 N1.1@14.871,25.629 ; N1.1 N1.1@14.871,25.629 ; N1.1@15,26.004 15,25.758 N1.1@14.871,25.629
NetN2_1: N2.1 R29.1 | length 13.2
  Bottom Layer w0.5: R29.1 27.964,26.514 37.986,26.514 N2.1 N2.1@39,25.897
NetN3_1: N3.1 R30.1 | length 12.8
  Bottom Layer w0.5: R30.1 51.964,26.514 61.986,26.514 N3.1
NetN4_1: N4.1 R31.1 | length 13.2
  Bottom Layer w0.5: R31.1 75.964,26.514 85.986,26.514 N4.1 N4.1@87,25.903
NetN5_1: N5.1 R32.1 | length 13.1
  Bottom Layer w0.5: R32.1 99.964,26.514 109.986,26.514 N5.1 N5.1@111,25.779
NetN6_1: N6.1 R33.1 | length 13.1
  Bottom Layer w0.5: R33.1 123.964,26.514 133.986,26.514 N6.1 N6.1@135,25.782
NetPWRLED_1: PWRLED.1 R3.2 | length 5.1
  Bottom Layer w0.5: PWRLED.1 47.55,56.799 R3.2
NetQ1_1: Q1.1 U4.1 | length 16.9
  Bottom Layer w0.5: Q1.1 66.04,39.04 v1(70,43) 70.096,43.096 71.163,43.096 72.098,44.031 U4.1@72.098,45.098
NetQ1_3: Q1.3 R5.2 U4.8 | length 36.3
  Top Layer w0.5: v1(74,43.3) v1(77.5,43.3)
  Bottom Layer w0.5: R5.2 66.228,33 65.486,32.258 60.002,32.258 Q1.3 63.805,33.96 73.145,43.3 v1(74,43.3) ; v1(77.5,43.3) 77.9,43.7 U4.8
NetR9_2: R9.2 RG1.2 U1.27 | length 25
  Top Layer w0.254: U1.27 126.25,44.819 128.512,42.557 134.943,42.557 ; v3(131.05,47.5) 131.05,46.45 134.943,42.557 ; RG1.2 134.943,42.557
  Bottom Layer w0.254: v3(131.05,47.5) R9.2
RTC_SCL: R1.1 U1.44 U3.16 | length 16.6
  Top Layer w0.254: U1.44@130.214,56.773 130.309,56.773 U1.44@130.34,56.742 ; U1.44@130.55,56.742 132.183,56.742 132.842,56.083 132.842,51.689 133.976,50.555 U3.16 136.555,50.555 v2(137,51)
  Bottom Layer w0.254: v2(137,51) 138.049,52.049 138.049,53.107 138.55,53.608 R1.1
RTC_SDA: R2.1 U1.45 U3.15 | length 19.7
  Top Layer w0.254: U1.45 132.394,57.25 133.35,56.294 133.35,52.324 133.849,51.825 U3.15 136.825,51.825 v2(137,52)
  Bottom Layer w0.254: v2(137,52) 137,58.45 R2.1
SWCLK: J3.3 R13.2 U1.49 | length 15.7
  Top Layer w0.254: J3.3 126,64.5 128.75,61.75 U1.49 128.75,59.408 128.092,58.75 v2(127,58.75)
  Bottom Layer w0.254: R13.2 122.641,59.309 125.294,59.309 125.853,58.75 v2(127,58.75)
SWDIO: J3.4 R12.2 U1.46 | length 19.6
  Top Layer w0.254: v2(128,57.75) U1.46 ; J3.4 128,64.151 129.319,62.832 129.319,61.718 129.718,61.319 131.681,61.319 v2(132,61) ; U1.46@130.55,57.758 133.292,57.758 v2(133.3,57.75)
  Bottom Layer w0.254: R12.2 128,59.95 v2(128,57.75) ; v2(132,61) 132,59.05 v2(133.3,57.75)
USART1_RX: J2.3 U1.43 | length 22.7
  Top Layer w0.254: v2(127,56.25) 127.181,56.431 128.282,56.431 128.463,56.25 U1.43
  Bottom Layer w0.254: J2.3 118,42.048 122.271,46.319 122.282,46.319 125.73,49.767 125.73,54.98 v2(127,56.25)
USART1_TX: J2.2 U1.42 | length 27.2
  Top Layer w0.254: v2(128,55.75) U1.42
  Bottom Layer w0.254: J2.2 117.376,39.624 121.031,39.624 121.412,40.005 121.412,44.807 126.184,49.579 126.184,53.667 128,55.483 v2(128,55.75)
V3.3: C1.2 C9.2 C12.2 C13.2 C14.2 C15.2 C16.2 C17.2 J1.3 J2.1 J3.1 J4.1 J4.2 R1.2 R2.2 R3.1 R12.1 R17.2 R22.1 R23.1 R24.1 R25.1 R26.1 R27.1 RG1.1 U1.1 U1.13 U1.19 U1.32 U1.48 U1.64 U3.2 U6.2 | length 506.3
  Top Layer w0.254: J1.3 76.27,65.486 J1.3@76.27,65.488 ; U1.13 v2(121.5,52.75) ; U1.1 119.45,62.45 J3.1 122,62.774 121.242,62.016 U1.64@121.242,60.55 ; v2(121.25,58.75) U1.64 ; v2(122,47) 122.25,47.25 U1.19 122.293,49.493 122.293,50.389 123.404,51.5 v2(123.5,51.5) ; v1(123,13) 126.348,9.652 138.811,9.652 146.177,17.018 146.177,47.148 v1(141.5,51.825) ; U1.32 129.305,48.895 136.882,48.895 139.812,51.825 v1(141.5,51.825) ; U1.48 131.194,58.75 133,60.556 J4.2 ; J4.1 134.564,67.564 138.176,67.564 139.065,66.675 139.065,64.762 143.277,60.55 145.952,60.55 146.939,59.563 146.939,52.578 146.186,51.825 U3.2 v1(141.5,51.825) ; RG1.1 139.5,49.825 v1(141.5,51.825)
  Top Layer w0.5: J1.3@76.57,65.335 78.927,67.691 119.309,67.691 J3.1
  Top Layer w1: J1.3@76.27,65.486 76.422,65.335 J1.3@76.57,65.335
  Bottom Layer w0.254: R22.1 19.64,17.55 20.26,18.17 33.739,18.17 34.36,17.55 R23.1 43.64,17.55 44.26,18.17 57.739,18.17 58.36,17.55 R24.1 67.64,17.55 68.26,18.17 81.739,18.17 82.36,17.55 R25.1 91.64,17.55 92.26,18.17 105.739,18.17 106.36,17.55 R26.1 115.64,17.55 116.26,18.17 129.739,18.17 130.36,17.55 R27.1 133.233,15.783 130.35,15.783 127.567,13 v1(123,13) ; C9.2 C9.2@50.45,47.021 ; R17.2 89.08,48.45 90.649,50.019 111.68,50.019 113.299,48.4 120.598,48.4 v2@121.998,47 ; C17.2@94.95,65 C17.2 ; J2.1 114,41.356 119.644,47 v2@121.998,47 ; C12.2 C12.2@115.05,65 ; v2(121.25,58.75) 121.25,53 v2(121.5,52.75) 122.75,51.5 v2(123.5,51.5) ; v2(122,47) v2@121.998,47 ; v2(122,47) v2@121.998,47 ; J3.1 122,63.05 R12.1 ; R2.2 R1.2 141.45,51.875 v1(141.5,51.825) 142.375,51.825 C1.2
  Bottom Layer w0.5: C9.2 52.578,49.128 52.578,57.222 54.792,59.436 72.382,59.436 76.27,63.324 J1.3 ; C9.2@50.45,47.021 R3.1 ; C17.2 C16.2 C15.2 C14.2 C13.2 C12.2 ; C12.2@115.05,65 J3.1 123.881,63.119 131.828,63.119 132.709,64 J4.2 J4.1
  Bottom Layer w1: U6.2@40,46.984 41.899,45.085 49.631,45.085 50.45,45.904 C9.2
V5: C8.2 C11.1 C18.1 J1.2 R11.2 R14.2 R15.2 R16.2 R18.2 R19.2 R20.2 U2.31 U2.32 U2.33 U5.2 U6.3 | length 134.2
  Top Layer w0.5: U2.33 74.61,59.085 74.61,60.8 75.4,61.59 ; U2.32 75.4,61.59 ; U2.31 76.2,62.39 ; J1.2 76.2,62.39 ; 75.4,61.59 76.2,62.39
  Bottom Layer w0.254: J1.2 78.81,65.127 J1.2@78.81,65.602 ; C18.1 84.582,64.132 84.582,67.056
  Bottom Layer w0.5: C8.2 47.55,66.911 47.55,65.914 50.3,63.164 C11.1 55.737,67.437 66.167,67.437 66.802,68.072 75.865,68.072 J1.2@78.81,65.127 ; J1.2@78.81,65.602 78.868,65.544 80.379,67.056 84.582,67.056 85.061,67.064 85.33,66.804 85.407,62.194 89.282,58.445 93.892,58.522 R19.2 ; R20.2 R19.2 ; R11.2 R14.2 R15.2 R16.2 R18.2 R19.2
  Bottom Layer w1: U6.3 41.5,49.977 44.069,52.546 44.069,62.231 U5.2 42.3,64.675 44.625,67 47.461,67 C8.2@47.55,66.911
V12: C4.2 C5.1 C10.1 F1.2 J1.1 L1.1 U4.2 U5.1 | length 137.5
  Bottom Layer w0.254: F1.2 F1.2@32.6,50.15 ; U5.1@37.6,64 U5.1 ; 62.912,56.769 62.942,56.799 ; C4.2 C4.2@70.95,54.048
  Bottom Layer w0.5: F1.2 38.508,43.942 50.8,43.942 52.772,45.914 52.772,47.565 53.721,48.514 53.721,55.499 54.991,56.769 62.912,56.769 ; C4.2 70.95,52.662 67.888,49.6 C5.1 66.213,48.387 69.178,48.387 71.2,46.365 U4.2 ; C4.2@70.95,54.048 70.95,55.288 69.469,56.769 62.972,56.769 62.942,56.799 64.436,58.293 74.643,58.293 J1.1
  Bottom Layer w1: L1.1@13.97,36.5 13.97,41.388 16.016,43.434 29.845,43.434 32.45,46.039 F1.2 ; F1.2@32.45,51.55 32.45,58.85 C10.1 32.6,60.286 36.314,64 U5.1@37.6,64 ; F1.2@32.6,50.15 32.45,50.3 F1.2@32.75,50.3
VH: C3.1 D1.2 J1.4 R4.2 R10.2 R28.2 R29.2 R30.2 R31.2 R32.2 R33.2 | length 226.3
  Top Layer w0.5: v1(27,31) v1(36,40) ; v1(55,46.8) v1(55,62) 58.404,65.404 58.404,66.104 v1(58.5,66.2)
  Bottom Layer w0.5: v1(36,40) 38.672,42.672 54.722,42.672 56.533,44.482 56.533,45.267 v1(55,46.8) ; D1.2 38.797,30.353 49.919,30.353 51,29.272 R30.2 ; v1(55,62) R10.2 ; v1(58.5,66.2) 63.178,66.2 63.653,66.675 72.182,66.675 73.73,65.127 J1.4 ; C3.1 94.35,33.1 R32.2
  Bottom Layer w0.8: R29.2 v1(27,31)
  Bottom Layer w1: R28.2 R29.2 R30.2 R31.2 R32.2 R33.2
pads on no net: BT1.0 DC12.0 N1.2 N1.13 N2.2 N2.13 N3.2 N3.13 N4.2 N4.13 N5.2 N5.13 N6.2 N6.13 S1.1 SP1.1 SP2.1 SP3.1 SP4.1 SW1.2 SW1.4 U1.2 U1.3 U1.4 U1.5 U1.6 U1.14 U1.29 U1.30 U1.33 U1.34 U1.35 U1.36 U1.37 U1.38 U1.39 U1.40 U1.50 U1.51 U1.52 U1.53 U1.54 U1.55 U1.56 U1.57 U1.58 U1.59 U1.61 U1.62 U2.36 U2.37 U2.38 U2.39 U2.41 U2.42 U2.43 U2.44 U3.1 U3.4

## Polygon pours and split planes (outlines as drawn)
GND on Top Layer (solid, remove dead copper, pour order 8): 84.953,69.99 84.953,43.942 98.171,43.942 98.171,29.972 150,29.972 149.987,29.959 149.987,0 0,0 0,69.977 84.94,69.977
DGND on Top Layer (solid, remove dead copper, pour order 2): 84.953,69.99 84.953,43.942 98.171,43.942 98.171,29.972 150,29.972 150,70 84.963,70
no net on Top Layer (solid, pour order 0): 84.973,70.104
GND on Bottom Layer (solid, remove dead copper, pour order 6): 84.963,70 84.963,43.95 98.171,43.95 98.171,30.006 149.966,30.006 150,29.972 149.987,29.959 149.987,0 0,0 0,70 84.963,70
DGND on Bottom Layer (solid, remove dead copper, pour order 4): 84.963,70 84.963,43.95 98.171,43.95 98.171,29.972 150,29.972 150,69.977 149.977,70

## Keep-outs
Keep-Out Layer:
  the board outline again, w0

## Silkscreen, mask and mechanical layers (free items; w line width, h text height)
Bottom Overlay:
  lines w0.254: 0,30 150,30 ; 0.5,44 54,44 54,69.5 ; 84.963,70 84.963,43.942 96.393,43.942 98.171,43.942 98.171,30
  text "DGND" at 69.05,69.4 h0.8 r90
  text "V3.3" at 76.67,69.4 h0.8 r90
  text "GND" at 71.59,69.1 h1 r90
  text "VH" at 74.13,69.1 h1 r90
  text "V5" at 79.21,69.1 h1 r90
  text "V12" at 81.75,69.1 h1 r90
  text "V3.3" at 122.4,69.1 h0.8 r90
  text "DGND" at 124.4,69.1 h0.8 r90
  text "CLK" at 126.4,69.1 h1 r90
  text "DIO" at 128.4,69.1 h1 r90
  text "V3.3" at 133,68 h0.8
  text "BT0" at 136,68 h0.8
  text "DGND" at 140,68 h0.8
  text "V3.3" at 133,61.5 h0.8
  text "BT1" at 136,61.5 h0.8
  text "DGND" at 140,61.5 h0.8
Top Solder:
  drawing of 11799 lines, arcs and shapes, not listed
  text "ON" at 4.5,49.5 h3
  text "OFF" at 22.5,49.5 h3
  text "CAUTION!" at 14.799,42.792 h2.2
  text "ИН-14" at 4.861,38.552 h1.2 r90
  text "High Voltage" at 14.799,34.83 h1.52
  text "Designed by P1neapp1e" at 1.749,32.115 h2
  text "ИН-14 Nixie Clock" at 1.749,30.115 h2
  text "2020.6" at 1.749,28.115 h2
Bottom Solder:
  drawing of 6640 lines, arcs and shapes, not listed
  text "P1neapp1e" at 108,31 h1.5